# Altium PCB ar_pcb.PcbDoc
Units mm, origin at the board's own origin, x right, y up, seen from the top; angles counter-clockwise.
Board outline 92.2 x 101.85 mm, 2 copper layers (Top Layer, Bottom Layer); 12 components, 22 nets, 107 pads, 14 vias.
Unrouted connection lines stored in the file: 3.
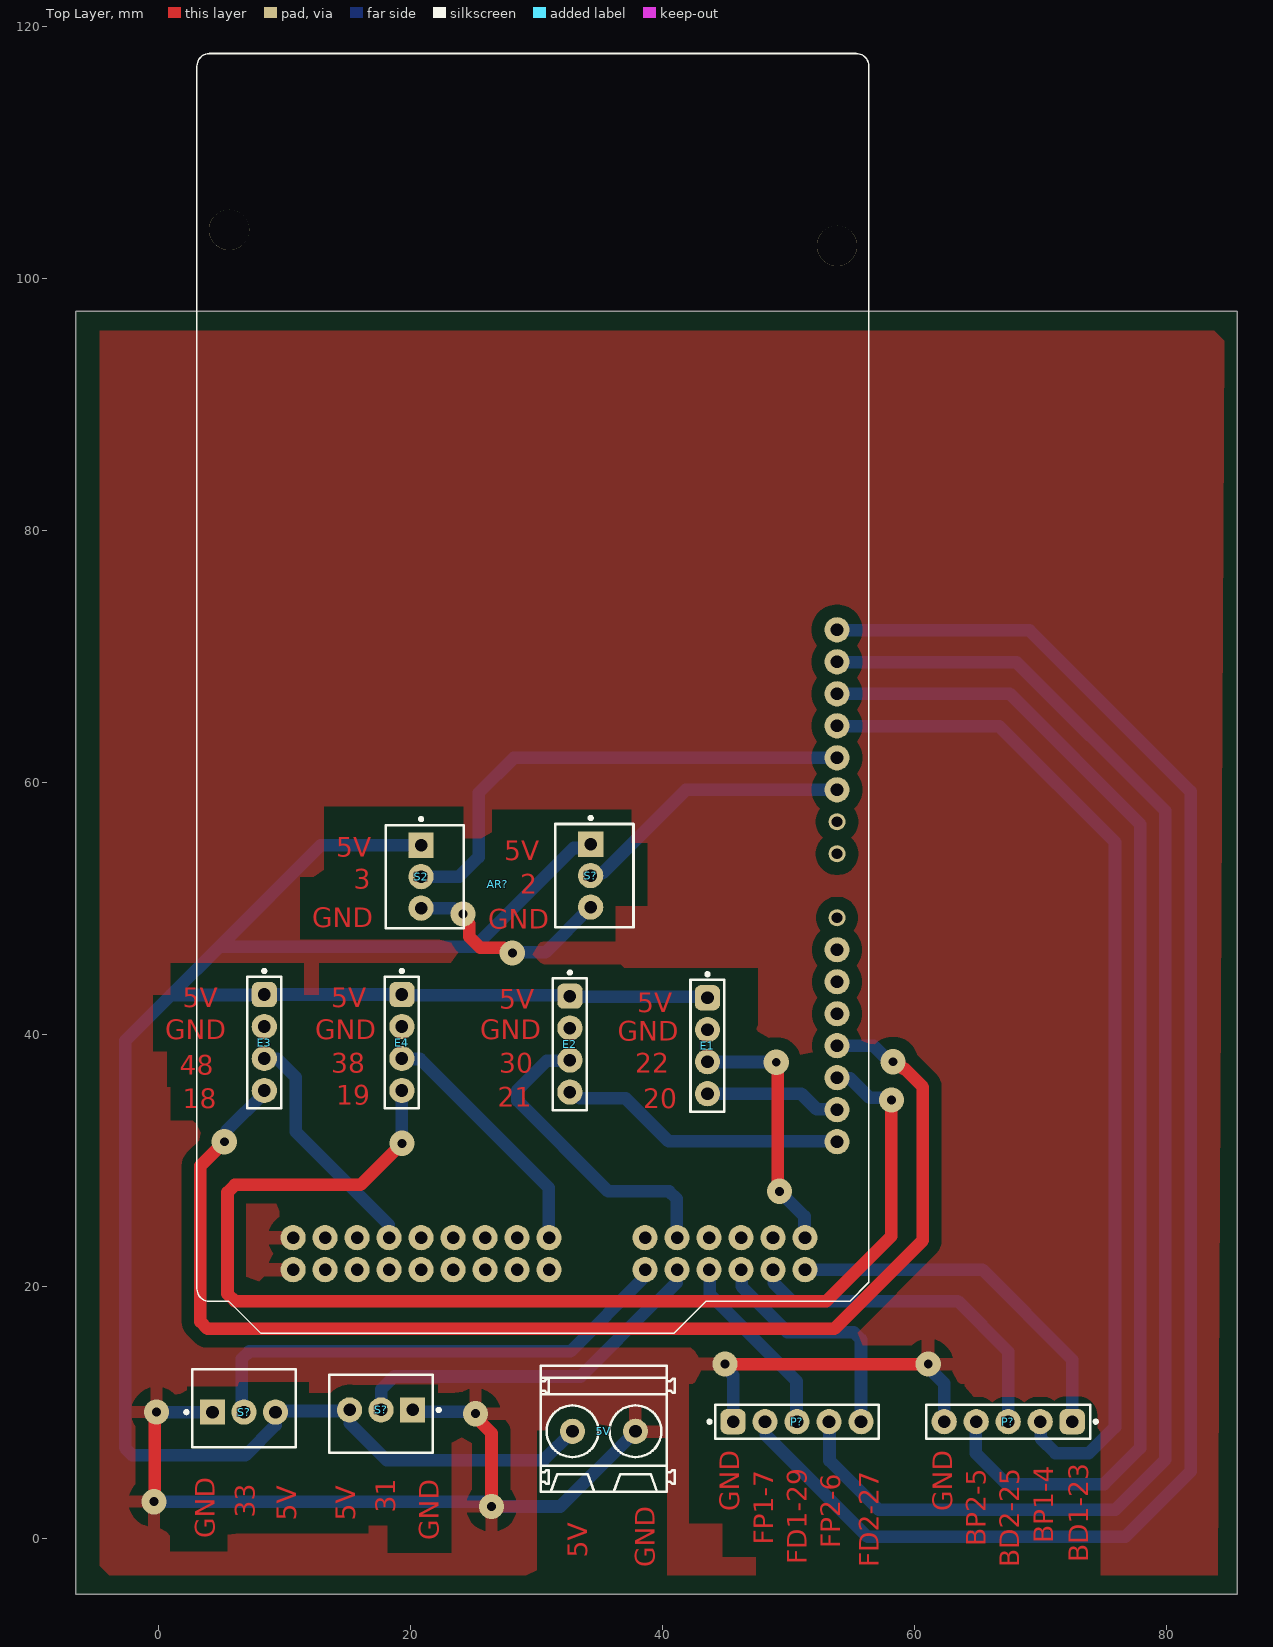
[diagram p0: Top Layer view]
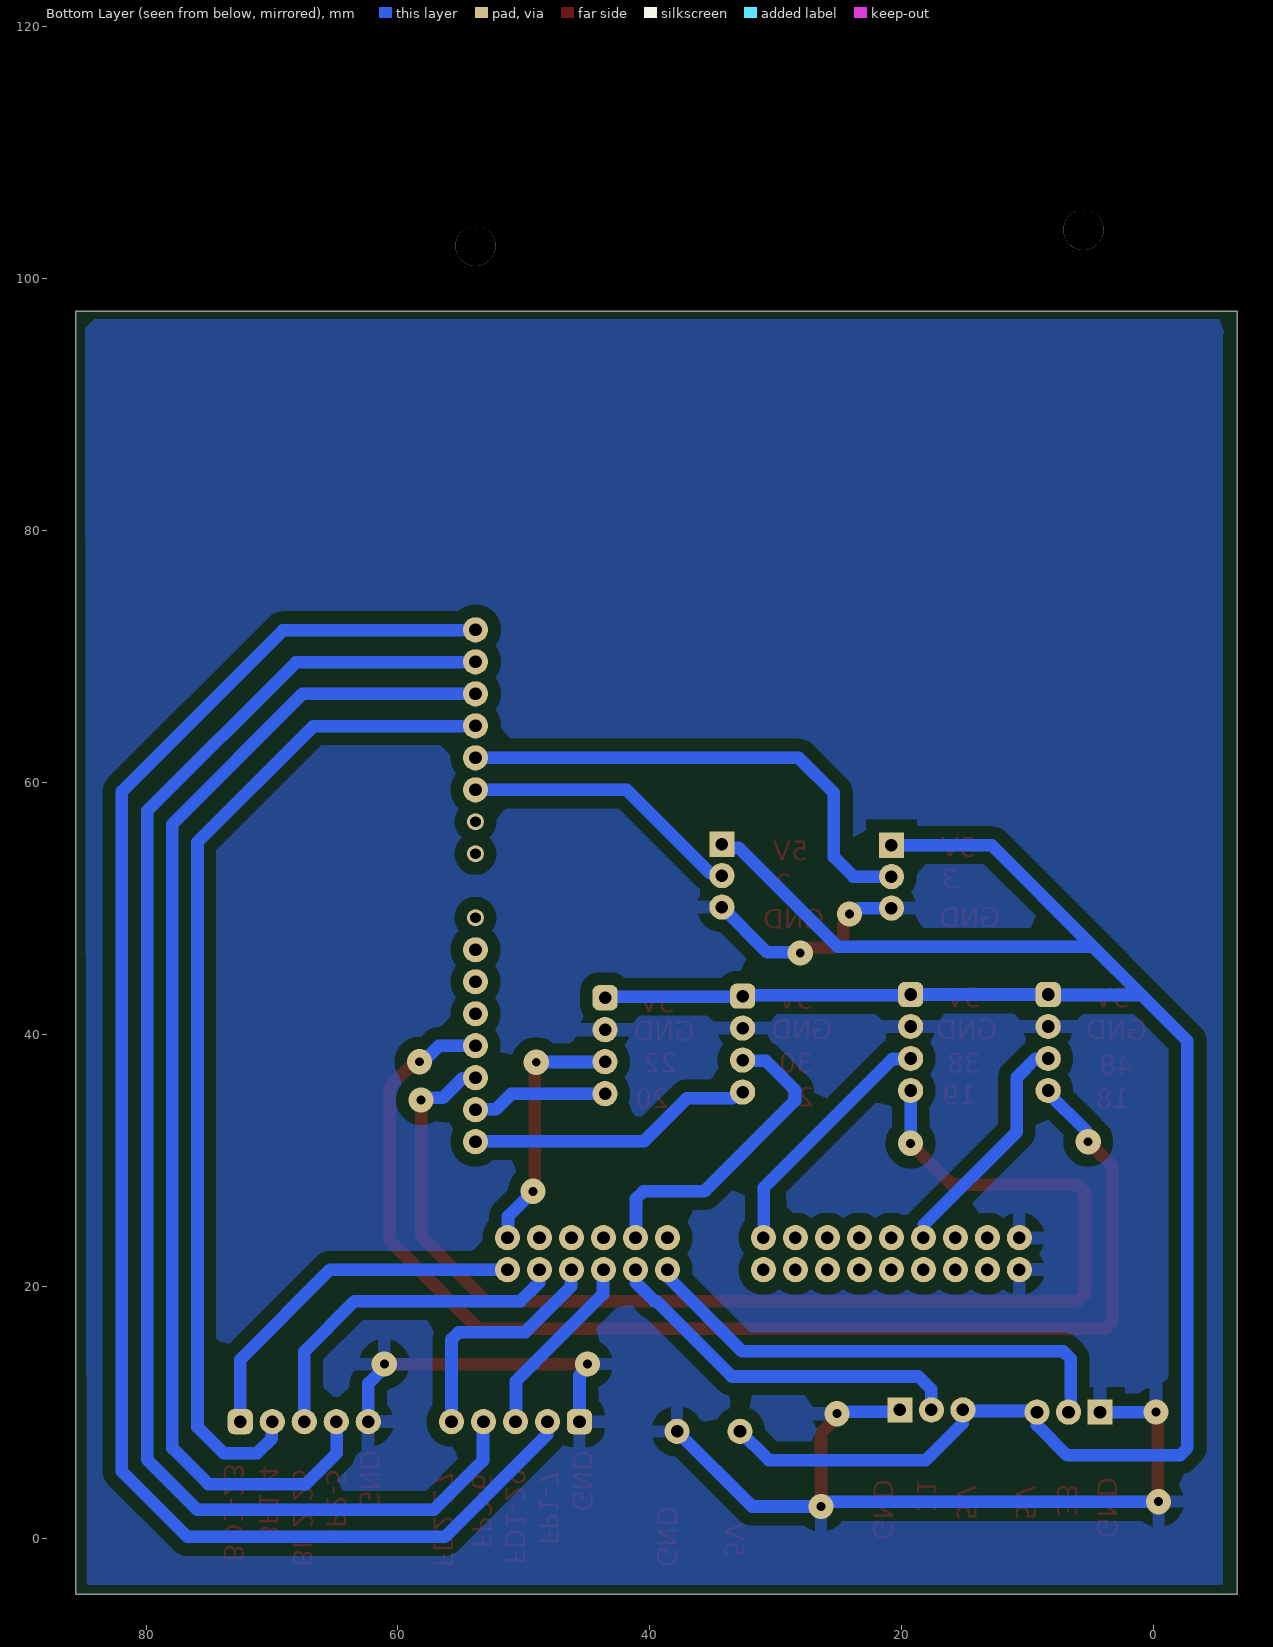
[diagram p1: Bottom Layer view, seen from below]
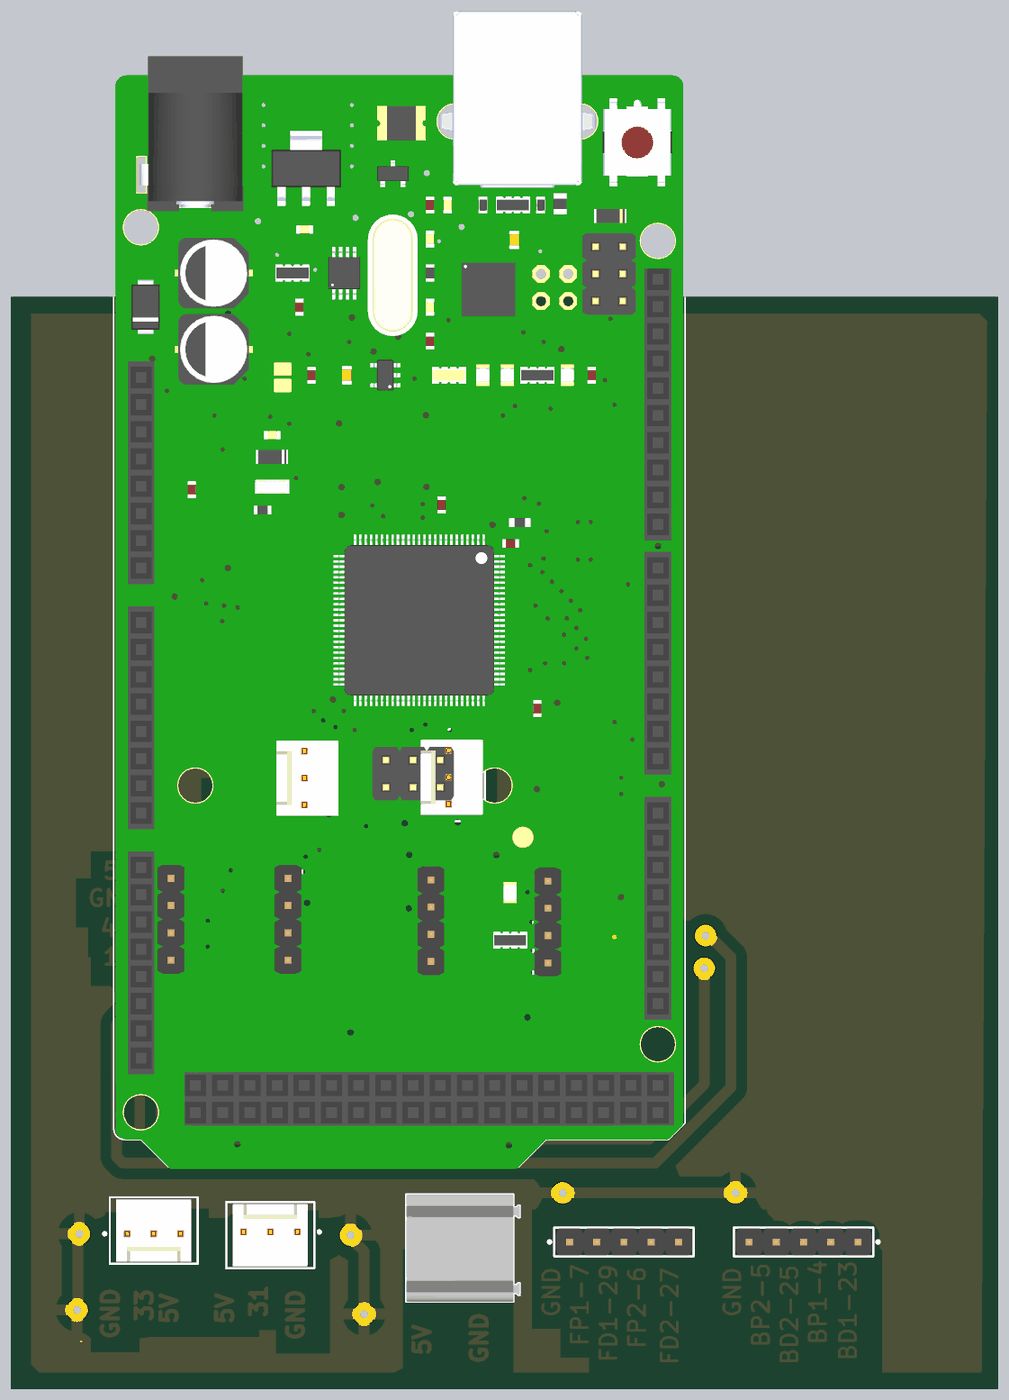
[diagram p2: 3D render of the assembled board from above, using the file's embedded part models]

## Layer stack, top to bottom
Top Solder: solder mask 0.0102, Solder Resist, Dk 3.5
Top Layer: signal copper 0.0356
Dielectric 1: dielectric 0.32, FR-4, Dk 4.8
Bottom Layer: signal copper 0.0356
Bottom Solder: solder mask 0.0102, Solder Resist, Dk 3.5

## Board outline
-6.604,-4.445 85.598,-4.445 85.598,97.409 -6.604,97.409

## Design rules (kind name [scope] priority, off if disabled: settings)
Clearance [All] p1: gap=1 ignorepadtopadclearanceinfootprint=FALSE
PlaneClearance [All] p1: clearance=1
PlaneConnect [All] p1: planeconnectstyle=Relief reliefexpansion=1 reliefentries=4 reliefconductorwidth=1 reliefairgap=1
PolygonConnect [All] p1: connectstyle=Relief reliefconductorwidth=1 reliefentries=4 polygonreliefangle="90 Angle" airgapwidth=1
RoutingVias [All] p1: holewidth=0.711 width=1.27 viastyle="Through Hole" minholewidth=0.711 minwidth=1.27 maxholewidth=0.711 maxwidth=1.27
SolderMaskExpansion [All] p1: expansion=0.102 istentingtop=FALSE
SupplyNets "Schematic Supply Nets" [InNet('GND')] p1: voltage=0.000
UnRoutedNet [All] p1: checkbadconnections=TRUE
Width [All] p1: maxlimit=1.6 minlimit=1 preferedwidth=1
27 further rules are at their usual default settings.

## Classes and differential pairs
component class ar_sch: 3 5V E1 E2 E3 E4 P? S2 S?

## Components (designator, comment, footprint, x,y, rotation, side; value= is the part's Value field where it differs from the comment)
5V "1715310000" LM_5_00_90_02 35.346,8.709 r0 top
AR? "ARDUINO_MEGA_2560_REV3_A000067" MODULE_A000067 9.004,73.051 r0 top locked
E1 "encoder1" 61300411121 43.561,39.116 r270 top
E2 "encoder2" 61300411121 32.639,39.243 r270 top
E3 "encoder3" 61300411121 8.382,39.37 r270 top
E4 "encoder4" 61300411121 19.304,39.37 r270 top
P? "61300511121" 61300511121 50.673,9.271 r0 top
P? "61300511121" 61300511121 67.437,9.271 r180 top
S2 "22-11-1031" FP-0022111031-MFG#1 21.128,52.538 r90 top
S? "22-11-1031" FP-0022111031-MFG#2 34.59,52.618 r90 top
S? "22-11-1031" FP-0022111031-MFG#3 6.771,10.333 r180 top
S? "22-11-1031" FP-0022111031-MFG#3 17.653,9.906 r0 top

## Footprints (in the part's own frame and the unit in brackets; to place one, negate y for a bottom-side part, rotate by r counter-clockwise, add the part's x,y. Pads: shape width x height; smd on the part's side, far side on the other; paste and mask are expansions set on the pad)
61300411121 [mm] "Pin Header, pitch 2.54 mm, THT, Vertical, single row, 4p"
  rrect50% 2x2 hole 1 mask+0.102: 1(-3.81,0)
  round 2 hole 1 mask+0.102: 2(-1.27,0) 3(1.27,0) 4(3.81,0)
  silkscreen extent -5.8,-1.34 5.23,1.34, body extent -5.08,-1.27 5.08,1.27, height 8.57
61300511121 [mm] "Pin Header, pitch 2.54 mm, THT, Vertical, single row, 5p"
  rrect50% 2x2 hole 1: 1(-5.08,0)
  round 2 hole 1: 2(-2.54,0) 3(0,0) 4(2.54,0) 5(5.08,0)
  silkscreen extent -7.07,-1.34 6.5,1.34, body extent -6.35,-1.27 6.35,1.27, height 8.57
FP-0022111031-MFG#1 [mm]
  rect 2x2 hole 1 paste-2539.97 mask+0.102: 1(2.5,0.3)
  round 2 hole 1 paste-2539.97 mask+0.102: 2(0,0.3) 3(-2.5,0.3)
  silkscreen extent -4.1,-3.1 4.7,3.1, body extent -4.2,-3.2 4.2,3.2, height 0.25
FP-0022111031-MFG#2 [mm]
  rect 2x2 hole 1 paste-2539.97 mask+0: 1(2.5,0.3)
  round 2 hole 1 paste-2539.97 mask+0.102: 2(0,0.3) 3(-2.5,0.3)
  silkscreen extent -4.1,-3.1 4.7,3.1, body extent -4.2,-3.2 4.2,3.2, height 0.25
FP-0022111031-MFG#3 [mm]
  rect 2x2 hole 1 paste-2539.97 mask+0: 1(2.5,0.3)
  round 2 hole 1 paste-2539.97 mask+0: 2(0,0.3) 3(-2.5,0.3)
  silkscreen extent -4.1,-3.1 4.7,3.1, body extent -4.2,-3.2 4.2,3.2, height 0.25
LM_5_00_90_02 [mm] "OMNIMATE Signal - Serie LM  LM 5.00/02/90 3.5"
  round 2 hole 1 mask+0.102: A1(-2.5,-0.2) A2(2.5,-0.2)
  silkscreen extent -5,-5 5.6,5, body extent -5,-5 5.6,5, height 13.81
MODULE_A000067 [mm]
  round 1.358 hole 0.85: 0(44.844,-18.695) 1(44.844,-16.155) 14(44.844,-23.775)
  round 2 hole 1: 2(44.844,-13.615) 3(44.844,-11.075) 4(44.844,-8.535) 5(44.844,-5.995) 6(44.844,-3.455) 7(44.844,-0.915) 15(44.844,-26.315) 16(44.844,-28.855) 17(44.844,-31.395) 18(44.844,-33.935) 19(44.844,-36.475) 20(44.844,-39.015) 21(44.844,-41.555) 22(42.304,-49.175) 23(42.304,-51.715) 24(39.764,-49.175) 25(39.764,-51.715) 26(37.224,-49.175) 27(37.224,-51.715) 28(34.684,-49.175) 29(34.684,-51.715) 30(32.144,-49.175) 31(32.144,-51.715) 32(29.604,-49.175) 33(29.604,-51.715) 38(21.984,-49.175) 39(21.984,-51.715) 40(19.444,-49.175) 41(19.444,-51.715) 42(16.904,-49.175) 43(16.904,-51.715) 44(14.364,-49.175) 45(14.364,-51.715) 46(11.824,-49.175) 47(11.824,-51.715) 48(9.284,-49.175) 49(9.284,-51.715) 50(6.744,-49.175) 51(6.744,-51.715) 52(4.204,-49.175) 53(4.204,-51.715) GND4(1.664,-49.175) GND5(1.664,-51.715)
  round 0 all layers, no hole: 5V_2(-9.004,-73.051) 5V_3(-9.004,-73.051) 8(-9.004,-73.051) 34(-9.004,-73.051) 35(-9.004,-73.051) 36(-9.004,-73.051) 37(-9.004,-73.051) AD0(-9.004,-73.051) AD1(-9.004,-73.051) AD2(-9.004,-73.051) AD3(-9.004,-73.051) AD4(-9.004,-73.051) AD5(-9.004,-73.051) AD6(-9.004,-73.051) AD7(-9.004,-73.051) ""(-9.004,-73.051) ""(-9.004,-73.051) ""(-9.004,-73.051) ""(-9.004,-73.051)
  round 3.2 hole 3.2 unplated: ""(-3.416,30.835) ""(44.844,29.565)
  silkscreen extent -5.97,-56.77 47.37,44.83, body extent -5.8,-56.97 47.2,51.03, height 13.23

## Part data
5V: library part CMP-1559-01745-1, "OMNIMATE Signal - series LM", Colour=Orange, Manufacturer=Weidmueller, Rated_current_use_group_B_UL_1059="15 A", Rated_voltage_for_surge_voltage_class_pollution_degree_II_2="630 V", Rated_voltage_use_group_B_UL_1059="300 V", UL_94_flammability_rating=V-0, ComponentLink1Description="Manufacturer URL", ComponentLink1URL=http://www.weidmueller.com/, ComponentLink2Description="URL Link1", ComponentLink2URL=http://catalog.weidmueller.com/catalog/Start.do?localeId=en&ObjectID=1715310000, Contact_material=Cu-Leg, Contact_surface=tinned, Insulating_material="Wemid (PA)", Mounting_onto_the_PCB="Solder connection", No_of_poles=2, PackageReference=LM_5_00_90_02, Packaging=Box, PartNumber=1715310000, Pitch_inch="0,197 inch", Pitch_mm="5 mm", Qty="500 PCS", Revision=V1, Short_text_for_material="LM 5.00/02/90 3.5SN OR BX", Side_termination_characteristic="closed side", Solder_pin_length_mm="3,5 mm", Solid_max_H05_07_V_U="2,5 mm²", Solid_min_H05_07_V_U="0,2 mm²", Wire_cross_section_AWG_max_UL_1059="AWG 14", Wire_cross_section_AWG_min_UL_1059="AWG 24"
AR?: "ATmega2560 Arduino Mega2560 AVRÂ® ATmega AVR MCU 8-Bit Embedded Evaluation Board", Package="Non-Standard Arduino", Check_prices=https://www.snapeda.com/parts/ARDUINO%20MEGA%202560%20REV3%20%7C%20A000067/Arduino/view-part/?ref=eda, MF=Arduino, MP="ARDUINO MEGA 2560 REV3 | A000067", SnapEDA_Link=https://www.snapeda.com/parts/ARDUINO%20MEGA%202560%20REV3%20%7C%20A000067/Arduino/view-part/?ref=snap
E1 E2 E3 E4: library part CMP-1502-01064-4, "THT Vertical Pin Header WR-PHD, Pitch 2.54 mm, Single Row, 4 pins", Color=Black, Contact Resistance=20mΩ, Current Rating=3A, Max Operating Temperature=105°C, Min Operating Temperature=-40°C, Operating Supply Voltage=250V, Connector Type="Male Pin", Contact Material=Gold, Contact Mating Length=5.9944mm, Contact Plating=Gold, Gender=Male, Height=8.89mm, Lead Free="Lead Free", Lead Pitch=2.54mm, Mount="Through Hole", Number of Contacts=4, Number of Pins=4, Number of Positions=4, Number of Rows=1, Orientation=Vertical, Packaging=Bulk, Pitch=2.54mm, RoHS=Compliant, Termination=Solder, Voltage Rating=250V
P? P?: library part CMP-1502-01068-4, "THT Vertical Pin Header WR-PHD, Pitch 2.54 mm, Single Row, 5 pins", Color=Black, Contact Resistance=20mΩ, Current Rating=3A, Max Operating Temperature=105°C, Min Operating Temperature=-40°C, Operating Supply Voltage=250V, Connector Type="Male Pin", Contact Material=Gold, Contact Mating Length=5.9944mm, Contact Plating=Gold, Gender=Male, Height=8.89mm, Lead Free="Lead Free", Lead Pitch=2.54mm, Mount="Through Hole", Number of Contacts=5, Number of Pins=5, Number of Positions=5, Number of Rows=1, Orientation=Vertical, Packaging=Bulk, Pitch=2.54mm, RoHS=Compliant, Termination=Solder, Voltage Rating=250V
S2 S? S? S?: library part CMP-00257-00247512-1, "22-11-1031 Mini-Latch™ Wire-to-Board Header, Vertical, with Friction Ramp, 3 Circuits, Gold (Au) Plating", Color=Natural, Contact Resistance=20mΩ, Current Rating=3A, Manufacturer Lifecycle Status=ACTIVE, Max Operating Temperature=105°C, Max Voltage Rating (DC)=250.25kV, Min Operating Temperature=-40°C, Voltage Rating=250V, Connector Type="Male Pin", Contact Gender=Male, Contact Material=Brass, Contact Mating Length=7.493mm, Contact Plating=Gold, Country of Origin=KR, Depth=4.9mm, Fastening Type=Friction, Gender=Male, Height=12.1mm, Housing Color=Natural, Housing Material=Nylon, Lead Free="Lead Free", Length=7mm, Lifecycle Status=Production, Mount="Through Hole", NexarPartId=247512, Number of Circuits=3, Number of Contacts=3, Number of Positions=3, Number of Rows=1, Orientation=Vertical, Packaging=Bulk, Pitch=2.5mm, Plating=Gold, Radiation Hardening=No, REACH SVHC=Unknown, RoHS=Compliant, Schedule B="8536694040, 8536694040", Termination=Solder

## Via types
v1: diameter 2, hole 0.711, Top Layer to Bottom Layer, 14 vias

## Nets (pads, with @x,y where several pads share a name; then routed paths per layer and width w, separated by ;. In a path a pad name is that pad's centre, name@x,y a point inside that pad or via, vN(x,y) a via of type N, cw(c..) or ccw(c..) an arc to the next point about the centre after c; other vN are vias at no path point)
E1: AR?.18 E3.4 | length 105.5
  Top Layer w1: v1(5.207,31.496) 3.302,29.591 3.302,17.223 3.888,16.637 53.628,16.637 60.666,23.675 60.666,35.834 59.202,37.298 59.112,37.298 58.564,37.846 v1(58.293,37.846)
  Bottom Layer w1: v1(5.207,31.496) 5.398,31.687 5.398,32.394 8.382,35.378 E3.4 ; 19.304,31.369 19.304,35.56 ; AR?.18 56.752,39.116 58.022,37.846 v1(58.293,37.846)
E2: AR?.19 E4.4 | length 94.5
  Top Layer w1: v1(19.304,31.369) 16.002,28.067 6.047,28.067 5.461,27.481 5.461,19.422 6.047,18.836 52.999,18.836 58.166,24.003 v1(58.166,34.798)
  Bottom Layer w1: AR?.19 53.888,36.536 54.884,36.536 56.43,34.989 57.975,34.989 v1(58.166,34.798)
E3: AR?.20 E1.4 | length 10.8
  Bottom Layer w1: E1.4 51.006,35.306 52.236,34.076 53.808,34.076 AR?.20
E4: AR?.21 E2.4 | length 22.8
  Bottom Layer w1: E2.4 32.91,35.433 33.41,34.933 37.076,34.933 40.473,31.536 53.808,31.536 AR?.21
GND: 5V.A2 AR?.GND4 AR?.GND5 E1.2 E2.2 E3.2 E4.2 P?.1@45.593,9.271 P?.5@62.357,9.271 S2.3 S?.1@4.271,10.033 S?.1@20.153,10.206 S?.3@34.29,50.118 | length 108.9
  Top Layer w1: v1(-0.381,2.921) -0.318,2.984 -0.318,9.882 v1(-0.167,10.033) ; v1(24.162,49.562) 24.162,49.291 24.662,48.791 24.662,47.766 25.541,46.887 27.391,46.887 27.923,46.355 v1@28.194,46.355 ; v1(25.146,9.906) 25.146,9.635 26.416,8.365 v1(26.416,2.54) ; v1(44.958,13.843) v1(61.087,13.843)
  Bottom Layer w1: v1(-0.381,2.921) 25.764,2.921 26.145,2.54 v1(26.416,2.54) 31.877,2.54 5V.A2 ; v1(-0.167,10.033) S?.1@4.271,10.033 ; S?.1@20.153,10.206 20.303,10.056 24.996,10.056 v1(25.146,9.906) ; S2.3 23.415,50.038 23.891,49.562 v1(24.162,49.562) ; v1@28.194,46.355 28.361,46.522 30.694,46.522 S?.3@34.29,50.118 ; v1(44.958,13.843) 44.958,13.572 45.593,12.937 P?.1@45.593,9.271 ; v1(61.087,13.843) 61.087,13.572 62.357,12.302 P?.5@62.357,9.271
  other v1: 28.067,46.482
Net5V_A1: 5V.A1 E1.1 E2.1 E3.1 E4.1 S2.1 S?.1@34.29,55.118 S?.3@9.271,10.033 S?.3@15.153,10.206 | length 178.4
  Bottom Layer w1: S?.3@9.271,10.033 9.271,8.997 6.878,6.604 -2.081,6.604 -2.667,7.19 -2.667,39.497 0.976,43.14 ; S?.3@9.654,10.12 15.066,10.12 15.153,10.206 15.153,9.17 18.1,6.223 30.56,6.223 5V.A1 ; S2.1 12.874,55.038 4.889,47.053 ; S?.1@34.29,55.118 34.099,55.118 33.79,54.809 32.945,54.809 25.126,46.99 4.953,46.99 4.889,47.053 ; E1.1 43.497,42.989 33.139,42.989 32.988,43.14 32.639,43.14 32.615,43.116 19.804,43.116 19.78,43.14 19.304,43.14 19.264,43.18 E3.1 8.342,43.14 0.976,43.14 ; 0.976,43.14 4.889,47.053
NetAR?_2: AR?.2 S?.2@34.29,52.618 | length 22.4
  Bottom Layer w1: S?.2@34.29,52.618 34.481,52.809 35.217,52.809 41.844,59.436 AR?.2
NetAR?_3: AR?.3 S2.2 | length 39.9
  Bottom Layer w1: S2.2 23.836,52.538 25.4,54.102 25.4,59.182 28.194,61.976 AR?.3
NetAR?_4: AR?.4 P?.2@69.977,9.271 | length 81
  Top Layer w1: AR?.4 AR?.4@53.888,64.476
  Bottom Layer w1: AR?.4 53.888,64.476 66.715,64.476 75.915,55.276 75.915,8.841 73.845,6.771 71.189,6.771 70.017,7.943 70.017,9.231 P?.2@69.977,9.271
NetAR?_5: AR?.5 P?.4@64.897,9.271 | length 96.2
  Top Layer w1: AR?.5 54.236,67.056 AR?.5@54.31,66.982
  Bottom Layer w1: AR?.5 67.564,67.056 77.915,56.705 77.915,7.176 75.057,4.318 67.31,4.318 64.857,6.771 64.857,8.809 64.897,8.849 P?.4@64.897,9.271
NetAR?_6: AR?.6 P?.4@53.213,9.271 | length 116.5
  Top Layer w1: AR?.6 AR?.6@53.888,69.556
  Bottom Layer w1: P?.4@53.213,9.271 53.253,9.231 53.253,6.183 57.15,2.286 75.946,2.286 79.915,6.255 79.915,57.753 68.112,69.556 53.888,69.556 AR?.6 ; 64.897,9.271 64.897,9.67 64.96,9.733 64.96,9.271
NetAR?_7: AR?.7 P?.2@48.133,9.271 | length 127.7
  Top Layer w1: AR?.7 AR?.7@53.888,72.096
  Bottom Layer w1: P?.2@48.133,9.271 48.173,9.231 48.173,8.235 56.281,0.127 76.708,0.127 81.915,5.334 81.915,59.309 69.128,72.096 53.888,72.096 AR?.7
NetAR?_22: AR?.22 E1.3 | length 20.4
  Top Layer w1: v1(49.022,37.806) 49.149,37.679 49.149,27.686 v1(49.276,27.559)
  Bottom Layer w1: E1.3 43.581,37.826 49.002,37.826 v1(49.022,37.806) ; v1(49.276,27.559) 51.268,25.567 51.268,23.916 AR?.22
NetAR?_23: AR?.23 P?.1@72.517,9.271 | length 29.1
  Bottom Layer w1: AR?.23 65.385,21.336 72.517,14.204 P?.1@72.517,9.271
NetAR?_25: AR?.25 P?.3@67.437,9.271 | length 27.5
  Bottom Layer w1: AR?.25 48.808,21.296 48.808,20.3 50.272,18.836 63.44,18.836 67.437,14.839 P?.3@67.437,9.271
NetAR?_27: AR?.27 P?.5@55.753,9.271 | length 19.1
  Bottom Layer w1: AR?.27 46.268,21.296 46.268,20.012 49.897,16.383 55.167,16.383 55.753,15.797 P?.5@55.753,9.271
NetAR?_29: AR?.29 P?.3@50.673,9.271 | length 15
  Bottom Layer w1: AR?.29 43.728,21.296 43.728,19.391 49.276,13.843 50.633,12.486 50.633,9.311 P?.3@50.673,9.271
NetAR?_30: AR?.30 E2.3 | length 24.9
  Bottom Layer w1: E2.3 32.599,37.933 30.821,37.933 28.481,35.593 28.481,34.765 35.687,27.559 40.522,27.559 41.108,26.973 41.108,23.916 AR?.30
NetAR?_38: AR?.38 E4.3 | length 19.9
  Bottom Layer w1: E4.3 19.344,38.06 20.741,38.06 30.948,27.853 30.948,23.916 AR?.38
NetAR?_44: AR?.48 E3.3 | length 18.9
  Bottom Layer w1: E3.3 8.422,38.06 9.418,38.06 10.882,36.596 10.882,32.278 18.248,24.912 18.248,23.916 AR?.48
Pr1: AR?.31 S?.2@17.653,10.206 | length 29.9
  Bottom Layer w1: S?.2@17.653,9.906 17.653,11.827 18.685,12.859 33.501,12.859 39.478,18.836 39.644,18.836 41.108,20.3 41.108,21.296 AR?.31
Pr2: AR?.33 S?.2@6.771,10.033 | length 38.8
  Bottom Layer w1: S?.2@6.604,10.688 6.604,14.273 7.19,14.859 32.673,14.859 38.54,20.726 38.54,21.268 AR?.33
pads on no net: AR?. AR?.0 AR?.1 AR?.5V_2 AR?.5V_3 AR?.8 AR?.14 AR?.15 AR?.16 AR?.17 AR?.24 AR?.26 AR?.28 AR?.32 AR?.34 AR?.35 AR?.36 AR?.37 AR?.39 AR?.40 AR?.41 AR?.42 AR?.43 AR?.44 AR?.45 AR?.46 AR?.47 AR?.49 AR?.50 AR?.51 AR?.52 AR?.53 AR?.AD0 AR?.AD1 AR?.AD2 AR?.AD3 AR?.AD4 AR?.AD5 AR?.AD6 AR?.AD7

## Polygon pours and split planes (outlines as drawn)
GND on Bottom Layer "GND_L02_P000" (solid, remove dead copper, pour order 0): 84.836,96.774 -5.842,96.774 -6.223,96.393 -5.461,95.631 -5.461,-3.683 84.582,-3.683 84.709,-3.81
GND on Top Layer "GND_L01_P001" (solid, remove dead copper, pour order 1): 84.582,95.377 84.074,95.885 -4.699,95.885 -4.699,-2.159 -3.937,-2.921 84.074,-2.921

## Other copper
Top Layer:
  text "5V" at 14.097,54.102 h1.52
  text "5V" at 27.432,53.848 h1.52
  text "3" at 15.494,51.562 h1.52
  text "2" at 28.702,51.181 h1.52
  text "GND" at 12.192,48.514 h1.52
  text "GND" at 26.162,48.387 h1.52
  text "5V" at 1.905,42.164 h1.52
  text "5V" at 13.716,42.164 h1.52
  text "5V" at 27.051,42.037 h1.52
  text "5V" at 37.973,41.783 h1.52
  text "GND" at 0.508,39.624 h1.52
  text "GND" at 12.446,39.624 h1.52
  text "GND" at 25.527,39.624 h1.52
  text "GND" at 36.449,39.497 h1.52
  text "38" at 13.716,36.957 h1.52
  text "30" at 27.051,36.957 h1.52
  text "22" at 37.846,36.957 h1.52
  text "48" at 1.651,36.83 h1.52
  text "19" at 14.097,34.417 h1.52
  text "21" at 26.924,34.29 h1.52
  text "18" at 1.905,34.163 h1.52
  text "20" at 38.481,34.163 h1.52
  text "GND" at 46.101,2.159 h1.52 r90
  text "GND" at 62.992,2.159 h1.52 r90
  text "31" at 18.796,2.032 h1.52 r90
  text "33" at 7.62,1.651 h1.52 r90
  text "5V" at 10.922,1.397 h1.52 r90
  text "5V" at 15.621,1.397 h1.52 r90
  text "GND" at 4.445,0 h1.52 r90
  text "GND" at 22.225,-0.127 h1.52 r90
  text "BP1-4" at 70.993,-0.381 h1.52 r90
  text "FP1-7" at 48.768,-0.508 h1.52 r90
  text "BP2-5" at 65.659,-0.635 h1.52 r90
  text "FP2-6" at 54.102,-0.762 h1.52 r90
  text "5V" at 34.036,-1.524 h1.52 r90
  text "BD1-23" at 73.787,-1.905 h1.52 r90
  text "FD1-29" at 51.435,-2.032 h1.52 r90
  text "GND" at 39.37,-2.286 h1.52 r90
  text "FD2-27" at 57.15,-2.286 h1.52 r90
  text "BD2-25" at 68.326,-2.286 h1.52 r90